# Altium PCB NanoD1.PcbDoc (part 2 of 2)
Units mm, origin at the board's own origin, x right, y up, seen from the top; angles counter-clockwise.
Board outline 66 x 38 mm, 4 copper layers (Top Layer, GND, POWER, Bottom Layer), stack 1.598 mm thick; 143 components, 106 nets, 507 pads, 211 vias.
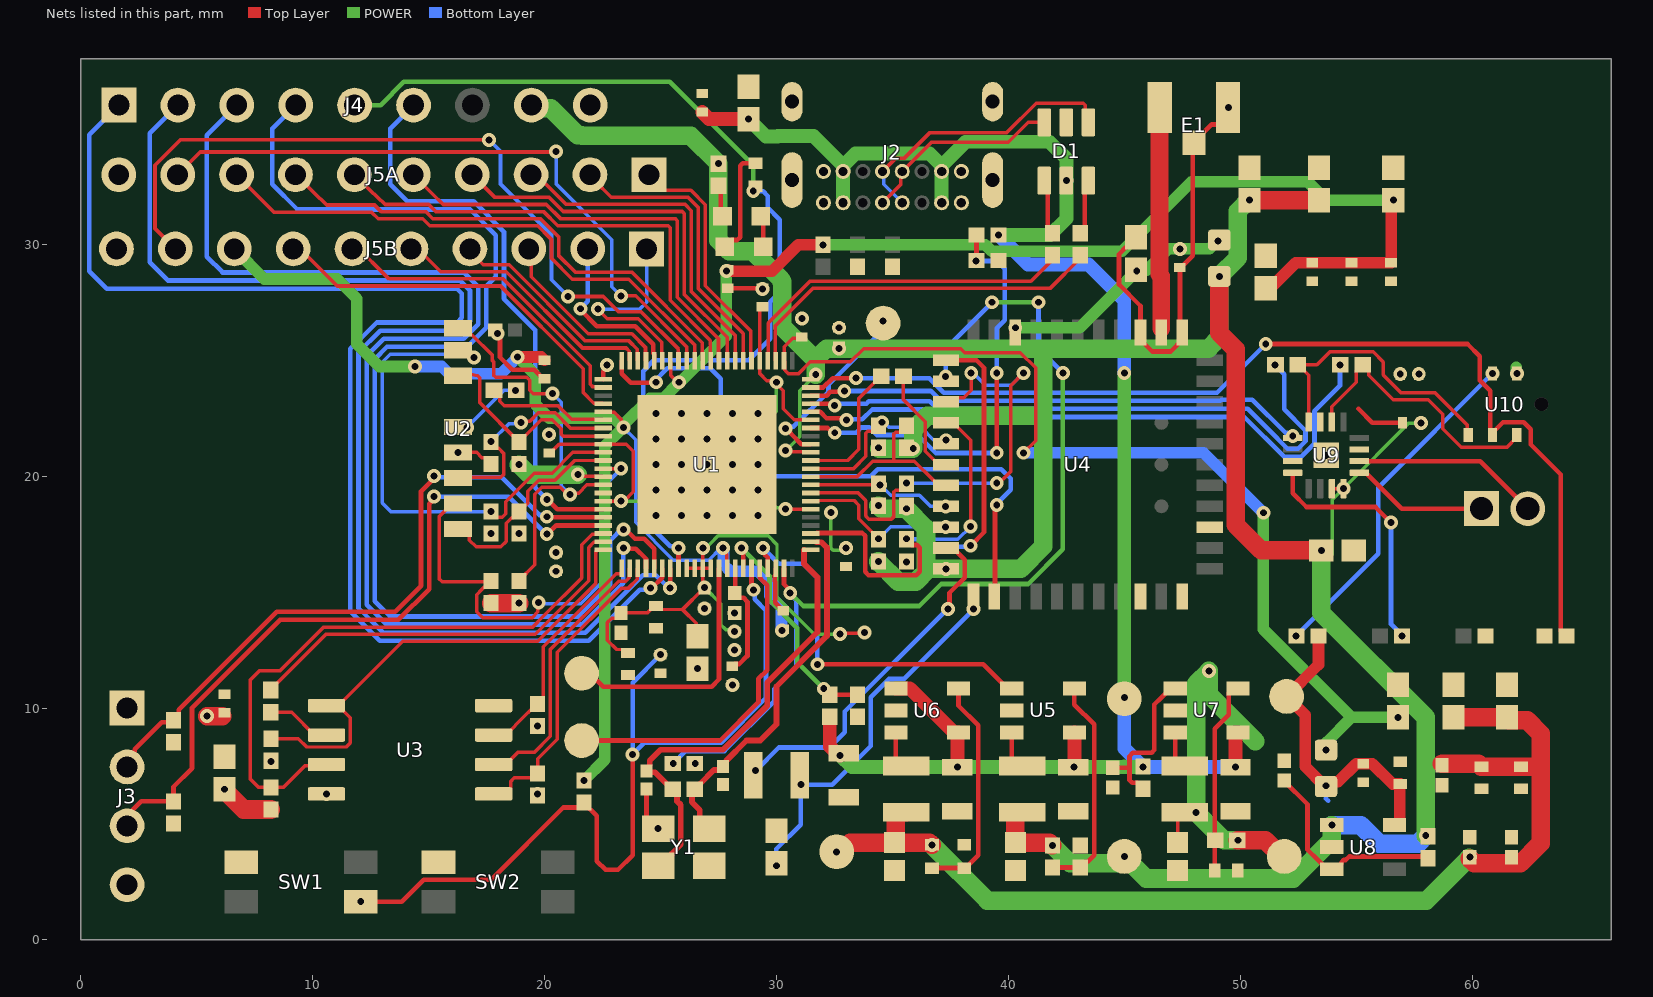
[diagram p4: the nets of this part, all layers, seen from the top]

## Via types
v1: diameter 0.6, hole 0.3, Top Layer to Bottom Layer, 211 vias

## Nets (pads, with @x,y where several pads share a name; then routed paths per layer and width w, separated by ;. In a path a pad name is that pad's centre, name@x,y a point inside that pad or via, vN(x,y) a via of type N, cw(c..) or ccw(c..) an arc to the next point about the centre after c; other vN are vias at no path point) (continued)
EN_1V8: C51.1 R51.1 U8.3 | length 9.2
  Top Layer w0.2: C51.1@51.9,6.871 51.9,6.85 52.9,5.85 52.9,3.896 53.346,3.45 53.35,3.45 53.75,3.05 U8.3@53.95,3.05 54.15,3.05 54.35,3.25 54.35,3.333 54.467,3.45 54.554,3.45 54.704,3.6 R51.1@58.1,3.6
EN_1V35: C50.1 R50.1 U7.1 | length 6.8
  Top Layer w0.2: C50.1@44.5,7.429 45.207,7.429 45.225,7.41 ; R50.1@45.8,6.525 45.8,6.55 45.575,6.775 45.342,6.775 45.225,6.892 45.225,7.41 ; U7.1@47.2,10.85 47,10.85 46.6,10.45 46.596,10.45 46.3,10.154 46.3,8.192 46.183,8.075 45.371,8.075 45.225,7.929 45.225,7.41
FB_1V35: R48.1 R49.2 U7.5 | length 8.4
  Top Layer w0.2: R49.2@48.9,3 48.9,4.275 R48.1@48.925,4.3 48.9,4.325 48.9,9.104 49.5,9.704 49.5,10.65 49.7,10.85 U7.5@49.9,10.85
FB_3V3: R44.1 R45.2 U5.5 | length 9.6
  Top Layer w0.2: R44.1@41.9,3.125 R45.2@43.1,3.125 43.1,3.15 43.325,3.375 43.429,3.375 43.7,3.646 43.7,9.3 42.85,10.15 U5.5@42.85,10.85
FB_VDDC: R46.1 R47.2 U6.5 | length 9.8
  Top Layer w0.2: R46.1@36.7,3.1 R47.2@38.1,3.1 38.15,3.1 38.7,3.65 38.7,9.254 37.85,10.104 U6.5@37.85,10.85
GND: C1.1 C2.2 C3.2 C4.2 C5.2 C6.1 C7.1 C8.2 C9.2 C10.2 C11.1 C12.1 C13.2 C14.2 C15.2 C16.2 C17.2 C18.1 C20.2 C21.2 C22.1 C24.1 C26.1 C28.2 C29.1 C30.1 C31.1 C32.1 C33.2 C34.2 C35.1 C36.1 C37.2 C38.1 C40.2 C41.2 C42.2 C43.2 C44.1 C45.2 C46.2 C47.2 C48.2 C49.2 C50.2 C51.2 C52.2 C53.1 C54.2 C55.1 C56.1 C57.1 C58.2 C59.2 C60.2 C61.1 C62.1 D1.2 E1.2 E1.3 J2.A1 J2.A12 J2.B1 J2.B12 J2.S1 J2.S2 J2.S3 J2.S4 J3.1 J4.9 J5A.10 J5B.10 LED1.C LED2.C R11.1 R12.1 R13.1 R14.1 R17.1 R24.1 R25.1 R37.1 R38.1 R42.1 R45.1 R47.1 R49.1 R56.2 R57.1 SW1.3 SW2.3 U1.1 U1.42 U1.89 U3.4 U4.1 U4.3 U4.20 U4.31 U4.33 U4.36 U5.2 U6.2 U7.2 U8.2 U9.3 U9.11 U9.15 U9.17 Y1.2 Y1.4 | length 32.3
  Top Layer w0.2: C37.2@6.2,7.901 6.4,7.701 C37.2@6.4,7.6 ; v1(8.2,7.7) R13.1@8.2,7.725 ; C59.2@17.871,26.3 C59.2@17.999,26.172 ; v1(17.971,26.144) C59.2@17.999,26.172 ; C26.1@20,24.2 19.95,24.2 19.564,24.586 18.614,24.586 18.079,25.121 18.079,26.114 18.021,26.172 C59.2@17.999,26.172 ; U1.1@22.525,24.175 22.525,24.517 22.7,24.692 v1(22.7,24.8) ; C55.1@24.4,6.51 24.4,5.275 24.875,4.8 v1(24.9,4.8) ; R25.1@26.475,7.6 v1(26.5,7.6) ; C16.2@26.6,11.698 v1(26.6,11.7) ; C24.1@27.97,28.1 C7.1@29.4,28.1 29.4,28.079 v1(29.399,28.078) ; LED1.C@29.325,31.2 29.425,31.1 LED2.C@29.425,29.9 ; U1.42@29.975,16.025 29.975,15.75 29.925,15.7 29.925,15.47 29.95,15.445 29.95,14.55 30.15,14.35 30.15,14.3 30.25,14.2 C29.1@30.3,14.2 ; v1(35.6,16.3) R24.1@35.6,16.325 ; v1(37.3,17.8) U4.20@37.313,17.8 ; C40.2@45.5,30.301 45.5,30.252 45.121,29.873 45.072,29.873 44.771,29.572 44.771,28.267 45.7,27.338 45.7,25.874 46.2,25.374 47,25.374 47.5,25.874 U4.1@47.5,26.187 47.4,26.287 C44.1@47.4,29 47.45,29 47.95,29.5 47.95,34.325 E1.3@48,34.375 48,34.4 48.767,35.167 49.05,35.167 49.475,35.592 E1.2@49.475,35.9 v1(49.5,35.9) ; 55.1,22.9 55.7,22.3 C61.1@57,22.3
  Bottom Layer w0.2: 53.7,6.1 53.8,6
  other v1: 19.7,9.225 28.1,11 28.2,12.5 28.2,14.1 26.9,14.3 20.5,15.9 24.8,18.3 25.9,18.3 27,18.3 28.1,18.3 29.2,18.3 24.8,19.4 25.9,19.4 27,19.4 28.1,19.4 29.2,19.4 24.8,20.5 25.9,20.5 27,20.5 28.1,20.5 29.2,20.5 53.7,20.9 24.8,21.6 25.9,21.6 27,21.6 28.1,21.6 29.2,21.6 20.2,21.8 24.8,22.7 25.9,22.7 27,22.7 28.1,22.7 29.2,22.7 56.9,24.4 32.7,26.4 31.1,26.8
GPIO_A15: J4.6 U1.17 | length 24.5
  Top Layer w0.2: v1(20.097,19) 20.125,19 20.55,18.575 U1.17@22.525,18.575
  Bottom Layer w0.2: J4.6@14.35,36 13.34,34.99 13.34,32.586 14.076,31.85 16.939,31.85 18.25,30.539 18.25,27.65 19.6,26.3 19.6,19.497 v1(20.097,19)
GPIO_AUX0: J4.5 R54.2 U1.30 | length 42.9
  Top Layer w0.2: U1.30@25.775,16.025 v1(25.775,16.9) v1@25.775,17
  POWER w0.2: J4.5@11.81,36 12.936,36 13.936,37 25.4,37 29,33.4 v1(29,32.3)
  Bottom Layer w0.2: v1(25.775,16.9) 25.698,16.977 25.416,16.977 24.25,18.143 24.25,24.533 24.717,25 28.8,25 29.732,25.932 29.732,27.522 30.15,27.94 30.15,31.06 29.625,31.585 29.625,32.08 29.427,32.278 29.022,32.278 v1(29,32.3)
HDR18_0: J5A.1 U1.72 | length 10.5
  Top Layer w0.15: J5A.1@24.5,33 25.175,32.325 25.263,32.325 26.314,32.325 26.939,31.7 26.939,28.212 28.902,26.249 28.902,24.998 U1.72@28.925,24.975
HDR18_1: J5A.2 U1.73 | length 12.7
  Top Layer w0.155: J5A.2@21.96,33 22.153,32.807 22.153,32.747 22.877,32.023 26.189,32.023 26.636,31.575 26.636,28.087 28.575,26.148 U1.73@28.575,24.975
HDR18_2: J5A.3 U1.74 | length 14.8
  Top Layer w0.155: J5A.3@19.42,33 19.656,33 20.938,31.718 26.063,31.718 26.332,31.449 26.332,27.961 28.225,26.068 U1.74@28.225,24.975
HDR18_3: J5A.4 U1.75 | length 17
  Top Layer w0.155: J5A.4@16.88,33 17.861,32.019 20.207,32.019 20.812,31.413 25.937,31.413 26.027,31.323 26.027,27.835 27.875,25.987 U1.75@27.875,24.975
HDR18_4: J5A.5 U1.76 | length 19
  Top Layer w0.155: J5A.5@14.34,33 15.14,32.2 15.626,31.714 20.081,31.714 20.686,31.109 25.632,31.109 25.722,31.018 25.722,27.708 27.502,25.929 27.502,24.998 U1.76@27.525,24.975
HDR18_5: J5A.6 U1.77 | length 21
  Top Layer w0.155: J5A.6@11.8,33 12.456,32.344 13.126,31.714 15.001,31.714 15.305,31.409 19.955,31.409 20.564,30.8 20.628,30.8 25.327,30.8 25.418,30.709 25.418,27.582 27.152,25.848 27.152,24.998 U1.77@27.175,24.975
HDR18_6: J5A.7 U1.78 | length 22.4
  Top Layer w0.155: U1.78@26.825,24.975 26.802,24.998 26.802,25.759 23.762,28.8 21.321,28.8 20.605,29.517 20.605,30.328 19.828,31.105 15.179,31.105 14.875,31.409 12.95,31.409 12.668,31.691 10.609,31.691 J5A.7@9.474,32.786 ; J5A.7@9.26,33 J5A.7@9.474,32.786 ; J5A.7@9.26,33 J5A.7@9.474,32.786 ; J5A.7@9.26,33 J5A.7@9.474,32.786
HDR18_7: J5A.8 U1.79 | length 24
  Top Layer w0.155: J5A.8@6.72,33 8.333,31.387 12.542,31.387 12.824,31.105 14.748,31.105 15.053,30.8 19.702,30.8 20.233,30.269 20.3,30.202 20.3,29.391 21.195,28.495 23.635,28.495 26.475,25.656 U1.79@26.475,24.975
HDR18_8: J5A.9 U1.80 | length 28.5
  Top Layer w0.155: J5A.9@4.18,33 5.157,33.977 20.477,33.977 v1(20.5,34) ; v1(23.3,27.773) 23.927,27.773 26.125,25.575 U1.80@26.125,24.975
  Bottom Layer w0.155: v1(20.5,34) 20.5,32.6 22.9,30.2 22.9,28.173 v1(23.3,27.773)
HDR18_9: J5B.9 U1.81 | length 33.2
  Top Layer w0.155: J5B.9@4.08,29.8 3.203,30.677 3.203,33.405 4.303,34.505 v1(17.608,34.505) ; v1(21.02,27.749) 21.023,27.746 22.535,27.746 23.19,27.091 24.164,27.091 25.775,25.48 U1.81@25.775,24.975
  Bottom Layer w0.155: v1(17.608,34.505) 18.1,34.012 18.1,32.6 20.3,30.4 20.3,28.469 v1(21.02,27.749)
HDR18_10: J5B.1 U1.83 | length 9.5
  Top Layer w0.15: v1(22.3,27.2) 22.711,26.789 24.038,26.789 25.05,25.777 25.05,25 U1.83@25.075,24.975 ; J5B.1@24.5,30 J5B.1@25.075,29.425
  Bottom Layer w0.15: v1@22.313,27.2 24.094,27.2 24.4,27.506 J5B.1@24.4,29.8
HDR18_11: J5B.2 U1.84 | length 7.2
  Top Layer w0.2: v1(21.55,27.219) 21.55,27.172 22.258,26.464 23.904,26.464 24.68,25.687 24.68,25.295 24.725,25.25 U1.84@24.725,24.975
  Bottom Layer w0.2: v1(21.55,27.219) 21.55,27.228 21.86,27.538 J5B.2@21.86,29.8
HDR18_12: J5B.3 U1.85 | length 8.2
  Top Layer w0.155: J5B.3@19.43,29.99 19.43,28.594 21.887,26.137 23.768,26.137 24.353,25.552 24.353,24.997 U1.85@24.375,24.975
HDR18_13: J5B.4 U1.86 | length 9.6
  Top Layer w0.155: J5B.4@16.78,29.8 16.78,29.688 17.355,29.114 18.479,29.114 21.761,25.832 23.642,25.832 24.002,25.472 24.002,24.998 U1.86@24.025,24.975
HDR18_14: J5B.5 U1.87 | length 11.6
  Top Layer w0.155: J5B.5@14.34,30 15.531,28.809 18.352,28.809 21.634,25.527 23.516,25.527 23.652,25.391 23.652,24.998 U1.87@23.675,24.975
HDR18_15: J5B.6 U1.2 | length 13.7
  Top Layer w0.155: J5B.6@11.8,30 13.295,28.505 18.226,28.505 21.973,24.758 21.973,23.966 22.091,23.848 22.502,23.848 U1.2@22.525,23.825
HDR18_16: J5B.7 U1.4 | length 16.7
  Top Layer w0.155: J5B.7@9.26,30 11.06,28.2 18.1,28.2 21.668,24.632 21.668,23.606 22.127,23.148 22.502,23.148 U1.4@22.525,23.125
I2C0_SCL: J4.1 U1.28 | length 57.4
  Top Layer w0.2: v1(24.575,15.175) 24.633,15.175 25.075,15.617 U1.28@25.075,16.025
  Bottom Layer w0.2: J4.1@1.65,36 0.371,34.721 0.371,28.829 1.115,28.085 16.227,28.085 16.434,27.878 16.434,26.834 16.227,26.627 12.771,26.627 11.629,25.485 11.629,14.171 12.9,12.9 21.9,12.9 24.099,15.099 24.499,15.099 v1(24.575,15.175)
I2C0_SDA: J4.2 U1.29 | length 55.3
  Top Layer w0.2: v1(25.418,15.182) 25.425,15.189 U1.29@25.425,16.025
  Bottom Layer w0.2: J4.2@4.19,36 2.97,34.78 2.97,29.23 3.765,28.435 16.372,28.435 16.784,28.023 16.784,26.689 16.372,26.277 12.916,26.277 11.979,25.34 11.979,14.316 13.045,13.25 21.755,13.25 24.23,15.725 24.803,15.725 25.346,15.182 v1(25.418,15.182)
I2S_BCLK: R58.1 U1.63 | length 26.3
  Top Layer w0.2: U1.63@31.475,23.125 32.328,23.125 32.406,23.047 v1(32.514,23.047) ; v1(51.5,24.8) R58.1@51.521,24.8
  Bottom Layer w0.2: v1(32.514,23.047) 32.59,23.124 33.885,23.124 33.986,23.225 36.607,23.225 36.932,22.9 50.322,22.9 51.207,22.015 52.037,21.185 52.493,21.185 52.815,21.507 52.815,21.963 51.9,22.878 51.9,24.4 v1(51.5,24.8)
I2S_BCLK_A: R58.2 U9.16 U10.1 | length 12.3
  Top Layer w0.15: R58.2@52.479,24.8 R58.2@52.5,24.8 ; U9.16@52.95,22.335 52.95,24.35 R58.2@52.5,24.8 ; U10.1@59.83,21.77 59.793,21.807 59.793,22.207 58.4,23.6 56.932,23.6 56.168,24.364 56.168,24.923 55.729,25.361 53.871,25.361 53.309,24.8 R58.2@52.5,24.8
I2S_DIN: R57.2 U1.65 U10.2 | length 45.4
  Top Layer w0.2: U1.65@31.475,23.825 32.023,23.825 32.422,24.224 v1(33.436,24.224) ; v1(51.1,25.7) 59.8,25.7 60.33,25.17 60.33,24.126 60.78,23.676 60.78,21.97 60.88,21.87 61.33,22.32 62.234,22.32 62.53,22.024 62.53,21.366 63.825,20.072 63.825,13.325 64.05,13.1 R57.2@64.075,13.1
  Bottom Layer w0.2: v1(33.436,24.224) 36.598,24.224 37.222,23.6 49,23.6 v1(51.1,25.7)
I2S_DOUT: U1.64 U9.1 | length 21.7
  Top Layer w0.2: U1.64@31.475,23.475 32.168,23.475 32.326,23.633 32.885,23.633 v1(32.926,23.674)
  Bottom Layer w0.2: v1(32.926,23.674) 36.653,23.674 37.077,23.25 49.145,23.25 49.195,23.3 50.522,23.3 51.952,21.87 52.021,21.87 52.157,21.735 v1(52.265,21.735)
I2S_LRCK: R59.1 U1.62 | length 27
  Top Layer w0.2: U1.62@31.475,22.775 31.883,22.775 32.16,22.497 32.948,22.497 v1(33.025,22.421) ; v1(54.3,24.8) R59.1@54.321,24.8
  Bottom Layer w0.2: v1(33.025,22.421) 33.054,22.45 33.706,22.45 34.131,22.875 36.462,22.875 36.787,22.55 50.177,22.55 51.892,20.835 52.638,20.835 53.2,21.397 53.2,22.8 54.3,23.9 v1(54.3,24.8)
I2S_LRCK_A: R59.2 U9.14 U10.3 | length 12
  Top Layer w0.15: U9.14@53.95,22.335 53.95,22.997 55,24.047 55,24.539 55.261,24.8 R59.2@55.279,24.8 55.257,24.779 R59.2@55.257,24.657 ; R59.2@55.247,24.647 55.434,24.647 55.542,24.539 55.542,24.351 56.593,23.3 58.1,23.3 58.733,22.667 58.733,22.048 59.537,21.245 61.505,21.245 61.93,21.67 U10.3@61.93,21.77
JTAG_TCK: J4.4 U1.27 | length 50.6
  Top Layer w0.2: v1@23.395,17.795 23.405,17.795 23.9,17.3 24.3,17.3 24.725,16.875 U1.27@24.725,16.025
  Bottom Layer w0.2: J4.4@9.27,36 8.26,34.99 8.26,32.586 9.346,31.5 16.794,31.5 17.9,30.394 17.9,28.6 17.484,28.184 17.484,26.417 17.466,26.399 17.466,26.382 16.662,25.577 13.206,25.577 12.679,25.05 12.679,14.606 13.335,13.95 21.465,13.95 22.825,15.31 22.825,17.225 v1@23.395,17.795
  other v1: 23.4,17.7
JTAG_TMS: J4.3 U1.26 | length 52.1
  Top Layer w0.2: v1@23.55,16.876 23.932,16.876 24.375,16.433 U1.26@24.375,16.025
  Bottom Layer w0.2: J4.3@6.73,36 5.43,34.7 5.43,29.47 6.115,28.785 16.517,28.785 17.134,28.167 17.134,26.544 16.517,25.927 13.061,25.927 12.329,25.195 12.329,14.461 13.19,13.6 21.61,13.6 23.4,15.39 v1(23.4,16.9)
LED_PWR_A: LED1.A R53.1 | length 1.4
  Top Layer w0.2: LED1.A@27.6,31.2 R53.1@27.6,32.567
LED_USR_A: LED2.A R54.1 | length 4.5
  Top Layer w0.2: LED2.A@27.775,29.9 28.057,30.182 28.317,30.182 28.434,30.299 28.434,33.383 28.551,33.5 R54.1@29,33.5
LPO: U1.88 U4.24 | length 27.5
  Top Layer w0.2: U1.88@23.325,24.975 23.325,24.417 23.72,24.022 24.672,24.022 v1@24.7,24.05 ; U4.24@39.4,14.813 39.423,14.836 v1@39.423,18.577
  Bottom Layer w0.2: v1@24.7,24.05 25.3,24.65 27.15,24.65 27.6,24.2 27.6,20.293 27.893,20 34.072,20 34.372,20.3 39.7,20.3 40.1,19.9 40.1,19.422 v1@39.43,18.752
  other v1: 39.5,18.752 24.8,24.05
LX_1V35: L3.1 U7.3 | length 1.7
  Top Layer w0.2: U7.3@47.2,8.95 47.2,7.8 47.5,7.5 L3.1@47.6,7.5
LX_3V3: L1.1 U5.3 | length 1.7
  Top Layer w0.2: U5.3@40.15,8.95 40.15,7.8 40.45,7.5 L1.1@40.6,7.5
LX_VDDC: L2.1 U6.3 | length 1.7
  Top Layer w0.2: U6.3@35.15,8.95 35.15,7.8 35.45,7.5 L2.1@35.6,7.5
MIC_EN: R60.1 U10.8 | length 14.9
  Top Layer w0.2: v1(52.4,13.1) R60.1@52.425,13.1
  Bottom Layer w0.2: v1(52.4,13.1) 55.95,16.65 55.95,19.5 v1(60.88,24.43)
PWM0_BUCK: TP3.1 U1.58 | length 7.9
  Top Layer w0.2: v1(30.4,22.058) 30.9,21.558 30.9,21.542 31.067,21.375 U1.58@31.475,21.375
  Bottom Layer w0.2: v1(30.4,22.058) 30.477,22.134 30.734,22.134 32.245,23.645 32.245,23.945 34.523,26.223 34.523,26.609 v1(34.6,26.686)
PWR_SEQ2: U1.41 U5.1 | length 16.4
  Top Layer w0.2: v1(29.425,16.9) 29.502,16.823 29.502,16.615 29.625,16.492 U1.41@29.625,16.025 ; v1(31.766,11.887) 38.913,11.887 39.95,10.85 U5.1@40.15,10.85
  Bottom Layer w0.2: v1(29.425,16.9) 30.099,16.226 31.152,16.226 31.766,15.612 v1(31.766,11.887)
RESET_N: C57.2 R52.2 SW1.2 U1.39 | length 37.8
  Top Layer w0.2: v1(12.075,1.65) 13.846,1.65 14.796,2.6 17.7,2.6 20.813,5.713 21.488,5.713 R52.2@21.7,5.925 ; R52.2@21.7,5.9 22.25,5.35 22.25,3.401 22.631,3.02 23.169,3.02 23.8,3.651 v1(23.8,8) ; U1.39@28.925,16.025 28.925,15.298 29.014,15.208 v1(29.014,15.1)
  Bottom Layer w0.2: v1(25,12.3) 23.8,11.1 v1(23.8,8) 24.3,8.5 27.613,8.5 29.55,10.437 29.55,14.204 29.058,14.696 29.058,15.056 v1(29.014,15.1)
SD0_CD: R7.2 U1.14 U2.9 | length 18
  Top Layer w0.15: U2.9@16.275,26.375 16.525,26.375 16.8,26.1 16.868,26.1 17.754,25.214 17.754,24.986 17.8,24.94 17.8,24.349 17.888,24.261 19.229,24.261 19.361,24.129 19.361,23.71 19.511,23.56 v1(20.345,23.56) ; R7.2@18.9,15.475 18.9,15.5 19.572,16.172 19.572,19.217 19.879,19.525 20.675,19.525 21,19.2 v1(21.1,19.2) 21.171,19.271 21.471,19.271 21.825,19.625 U1.14@22.525,19.625
  Bottom Layer w0.15: v1(20.345,23.56) 20.725,23.18 20.725,19.575 v1(21.1,19.2)
SD0_CLK: R1.2 U1.6 | length 5.4
  Top Layer w0.15: R1.2@17.821,23.7 18.067,23.455 18.067,23.233 18.265,23.035 20.582,23.035 21.167,22.45 22.5,22.45 U1.6@22.525,22.425
SD0_CLK_SD: R1.1 U2.5 | length 3.2
  Top Layer w0.15: U2.5@16.275,22.125 16.625,22.125 v1(16.65,22.1) ; v1(18.757,23.7) R1.1@18.779,23.7
  Bottom Layer w0.15: v1(16.65,22.1) 18.25,23.7 v1(18.757,23.7)
SD0_CMD: R2.2 U1.7 U2.3 | length 9.3
  Top Layer w0.15: U2.3@16.275,19.925 16.3,19.95 18.118,19.95 18.25,20.082 18.25,20.968 18.018,21.2 17.95,21.2 17.7,21.45 R2.2@17.7,21.475 v1(17.7,21.5) ; v1(18.991,22.309) 19.053,22.371 19.372,22.371 19.736,22.735 20.457,22.735 21.117,22.075 U1.7@22.525,22.075
  Bottom Layer w0.15: v1(17.7,21.5) 18.466,22.266 18.949,22.266 v1(18.991,22.309)
SD0_D0: R3.2 U1.8 U2.7 | length 8.9
  Top Layer w0.15: U2.7@16.3,24.5 16.312,24.497 17.112,24.325 17.2,24.237 17.2,23.175 R3.2@18.9,21.475 18.9,21.5 19.15,21.75 19.175,21.75 19.86,22.435 20.333,22.435 20.725,22.043 20.725,21.813 20.813,21.725 U1.8@22.525,21.725
SD0_D1: R4.2 U1.10 U2.8 | length 22.6
  Top Layer w0.15: U2.8@16.275,25.425 16.532,25.425 16.754,25.203 16.876,25.203 v1(16.962,25.116) ; v1(17.7,18.475) 17.95,18.225 18.183,18.225 18.332,18.375 18.332,18.9 19.557,20.125 20.325,20.125 21.225,21.025 U1.10@22.8,21.025
  Bottom Layer w0.15: v1(16.962,25.116) 16.841,25.116 16.705,25.252 13.341,25.252 13.004,24.915 13.004,18.842 13.371,18.475 v1(17.7,18.475)
SD0_D2: R5.2 U1.11 U2.1 | length 9
  Top Layer w0.15: U2.1@16.275,17.725 16.484,17.725 16.759,17.45 16.759,17.241 17.05,16.95 18.118,16.95 18.35,17.182 18.35,17.968 18.582,18.2 18.65,18.2 18.9,18.45 R5.2@18.9,18.475 18.9,18.5 19.15,18.75 19.184,18.75 19.272,18.838 19.272,19.342 19.755,19.825 20.449,19.825 21.299,20.675 U1.11@22.525,20.675
SD0_D3: R6.2 U1.12 U2.2 | length 20
  Top Layer w0.15: U2.2@16.275,18.825 16.025,18.825 15.45,18.25 15.45,15.582 15.582,15.45 17.675,15.45 R6.2@17.7,15.475 17.7,15.45 17.45,15.2 17.382,15.2 17.282,15.1 17.075,14.893 17.075,14.157 17.332,13.9 19.468,13.9 19.713,14.145 19.713,14.513 v1(19.75,14.55) ; U1.12@22.525,20.325 v1@23.212,20.325
  Bottom Layer w0.15: v1(19.75,14.55) 19.8,14.5 21.555,14.5 22.5,15.445 22.5,19.512 23.212,20.224 v1@23.212,20.325
  other v1: 23.3,20.325
SD0_PWR_EN: U1.15
SD1_CLK: R18.2 U1.56 | length 5.8
  Top Layer w0.15: U1.56@31.475,20.675 32.421,20.675 33.067,20.675 33.55,21.158 33.55,23.35 34.5,24.3 R18.2@34.521,24.3
SD1_CLK_W: R18.1 U4.17 | length 4.7
  Top Layer w0.15: R18.1@35.479,24.3 35.479,23.29 36.425,22.343 36.425,21.076 37.001,20.5 U4.17@37.313,20.5
SD1_CMD: R19.2 U1.55 U4.16 | length 7.4
  Top Layer w0.15: U1.55@31.475,20.325 33.325,20.325 33.85,20.85 33.85,21.85 33.941,21.941 34.166,21.941 R19.2@34.4,22.175
  Bottom Layer w0.15: v1(34.55,22.325) 34.638,22.325 34.863,22.1 36.237,22.1 36.787,21.55 v1(37.313,21.55)
SD1_D0: R20.2 U1.54 U4.18 | length 8.3
  Top Layer w0.15: U1.54@31.475,19.975 33.475,19.975 34.15,20.65 35.05,20.65 ; R20.2@35.6,22.175 35.6,22.15 35.35,21.9 35.141,21.9 35.05,21.809 35.05,20.65 ; 36.75,19.85 35.95,20.65 35.05,20.65 ; U4.18@36.751,19.85 37,19.6 U4.18@37.05,19.6 ; U4.18@37.25,19.537 U4.18@37.313,19.6
SD1_D1: R21.2 U1.53 U4.19 | length 6.2
  Top Layer w0.15: U1.53@31.475,19.625 34.35,19.625 R21.2@34.4,19.675 34.425,19.675 v1(34.475,19.625)
  Bottom Layer w0.15: v1(34.475,19.625) 34.925,19.175 36.167,19.175 36.642,18.7 v1(37.3,18.7)
SD1_D2: R22.2 U1.52 U4.14 | length 20.7
  Top Layer w0.15: U1.52@31.475,19.275 33.525,19.275 33.85,18.95 33.85,18.282 33.982,18.15 34.962,18.15 35.05,18.238 35.05,19.312 35.138,19.4 35.35,19.4 35.6,19.65 R22.2@35.6,19.675 v1(35.6,19.7) ; U4.14@37.001,23.2 U4.14@37.313,23.2 37.488,23.375 38.075,23.375 38.4,23.7 v1(38.4,24.45) ; v1@39.4,19.5 40.1,20.2 40.1,23.9 v1(40.65,24.45)
  Bottom Layer w0.15: v1(35.6,19.7) v1(39.5,19.7) ; v1(38.4,24.45) 38.492,24.45 39.017,23.925 40.125,23.925 v1(40.65,24.45)
SD1_D3: R23.2 U1.51 U4.15 | length 13.7
  Top Layer w0.15: U1.51@31.475,18.925 31.5,18.95 31.863,18.95 33.35,18.95 33.55,18.75 33.55,18.158 34.15,17.558 34.15,17.55 34.392,17.308 R23.2@34.4,17.308 ; R23.2@34.4,17.275 v1(34.4,17.3) ; U4.15@37.313,22.3 37.626,22.3 37.8,22.125 38.374,21.552 v1@38.374,17.826
  Bottom Layer w0.15: v1(34.4,17.3) 34.925,17.825 36.114,17.825 36.664,17.275 37.823,17.275 v1@38.374,17.826
  other v1: 38.375,17.826
SD_MODE_SET: R55.2 U9.4 | length 10.7
  Top Layer w0.2: U9.4@52.265,20.15 52.265,19.261 52.857,18.669 55.831,18.669 v1(56.5,18)
  Bottom Layer w0.2: v1(56.5,18) 56.5,13.627 56.975,13.152 v1(56.975,13.1)
SEQ1_TP: TP2.1 U1.40 | length 14.4
  Top Layer w0.2: TP2.1@21.6,8.6 27.57,8.6 29.225,10.255 29.225,11.255 29.6,11.63 29.6,15.3 29.45,15.45 29.442,15.45 29.275,15.617 U1.40@29.275,16.025
SPI_CLK: R8.2 U1.21 | length 17.8
  Top Layer w0.15: R8.2@8.2,10.779 8.2,10.8 10.575,13.175 19.591,13.175 21.9,15.484 21.9,16.922 22.128,17.15 22.5,17.15 U1.21@22.525,17.175
SPI_CLK_F: R8.1 U3.6 | length 2.8
  Top Layer w0.15: R8.1@8.2,9.821 9.094,9.821 10.08,8.835 U3.6@10.595,8.835
SPI_CS: R9.2 U1.25 U3.1 | length 13.3
  Top Layer w0.15: U3.1@17.805,6.295 18.32,6.295 18.535,6.51 18.535,6.835 18.7,7 19.525,7 R9.2@19.7,7.175 19.7,7.808 20.55,8.658 20.55,12.401 23.324,15.175 23.622,15.175 24.002,15.555 24.002,16.002 U1.25@24.025,16.025
SPI_HOLD: R10.2 U1.20 U3.7 | length 26.8
  Top Layer w0.15: U3.7@10.595,7.565 10.533,7.503 9.653,7.503 8.725,6.575 R10.2@8.2,6.575 7.676,6.575 7.3,6.951 7.3,11.2 7.7,11.6 8.576,11.6 10.451,13.475 19.467,13.475 19.992,14 21.6,15.608 21.6,17.047 22.055,17.502 22.502,17.502 U1.20@22.525,17.525
SPI_MISO: U1.24 U3.2 | length 11.8
  Top Layer w0.15: U3.2@17.805,7.565 18.32,7.565 18.855,8.1 19.568,8.1 20.25,8.782 20.25,12.526 23.199,15.475 23.497,15.475 23.65,15.628 23.65,16 U1.24@23.675,16.025
SPI_MOSI: R13.2 U1.22 U3.5 | length 21
  Top Layer w0.15: R13.2@8.2,8.675 9.384,8.675 9.739,8.32 11.451,8.32 11.625,8.494 11.625,9.59 U3.5@11.11,10.105 ; U3.5@10.595,10.105 U3.5@11.11,10.105 ; U1.22@22.525,16.825 22.25,16.825 22.225,16.8 22.225,16.737 22.2,16.712 22.2,15.359 19.716,12.875 13.88,12.875 U3.5@11.11,10.105
SPI_WP: R14.2 U1.23 U3.3 | length 9.9
  Top Layer w0.15: U3.3@17.805,8.835 18.32,8.835 19.15,9.665 19.15,9.668 19.282,9.8 19.285,9.8 19.385,9.9 19.45,9.9 R14.2@19.7,10.15 ; R14.2@19.7,10.175 19.95,10.425 19.95,10.538 19.95,12.65 23.088,15.788 23.3,15.788 23.325,15.813 U1.23@23.325,16.025
SPK_N: J6.2 U9.10 | length 8.1
  Top Layer w0.2: U9.10@55.135,20.65 60.35,20.65 J6.2@62.4,18.6
SPK_P: J6.1 U9.9 | length 5.9
  Top Layer w0.2: U9.9@55.135,20.15 55.42,20.15 56.97,18.6 J6.1@60.4,18.6
UART0_RX: J3.3 R12.2 U1.19 | length 31.2
  Top Layer w0.2: J3.3@1.8,5.16 2.615,5.975 R12.2@4,5.975 ; R12.2@4,6.175 4,6.6 4.8,7.4 4.8,10.005 8.595,13.8 13.7,13.8 15.025,15.125 15.025,18.807 15.225,19.007 v1(15.225,19.116) ; v1(20.097,17.5) 20.125,17.5 20.5,17.875 U1.19@22.525,17.875
  Bottom Layer w0.2: v1(15.225,19.116) 18.453,19.116 20.069,17.5 v1(20.097,17.5)
UART0_TX: J3.2 R11.2 U1.18 | length 29.1
  Top Layer w0.2: J3.2@1.8,7.7 1.888,7.7 2.322,8.134 2.322,8.222 3.492,9.392 3.817,9.392 R11.2@3.9,9.475 ; R11.2@4,9.475 4.225,9.7 4.225,9.925 8.45,14.15 13.555,14.15 14.675,15.27 14.675,19.343 15.225,19.893 v1(15.225,20) ; v1(20.097,18.25) 20.122,18.225 U1.18@22.525,18.225
  Bottom Layer w0.2: v1(15.225,20) 15.275,19.95 18.15,19.95 19.773,18.327 20.02,18.327 v1(20.097,18.25)
USB_DM: R40.1 U1.70 | length 15.2
  Top Layer w0.155: U1.70@29.625,24.975 29.648,24.998 29.648,25.451 29.648,26.602 31.446,28.4 40.975,28.4 R40.1@42,29.425
USB_DM_CON: D1.3 J2.A7 J2.B7 | length 8.7
  Top Layer w0.155: J2.A7@34.575,31.79 35.368,32.583 35.368,33.083 J2.B7@35.425,33.14 36.685,34.4 40,34.4 40.855,35.255 D1.3@41.55,35.255
USB_DM_MID: D1.4 R40.2 | length 2.6
  Top Layer w0.2: D1.4@41.55,32.745 41.7,32.595 41.7,30.7 42,30.4 R40.2@42,30.375
USB_DP: R39.1 U1.69 | length 15.9
  Top Layer w0.155: 29.952,25.451 29.952,26.476 31.572,28.095 41.795,28.095 43.1,29.4 R39.1@43.1,29.425 ; 29.952,25.451 29.952,24.998 U1.69@29.975,24.975
USB_DP_CON: D1.1 J2.A6 J2.B6 | length 12.7
  Top Layer w0.155: J2.B6@34.575,33.14 35.136,33.701 35.501,33.701 36.6,34.8 39.917,34.8 41.204,36.087 43.226,36.087 43.316,35.997 43.316,35.389 D1.1@43.45,35.255 ; J2.A6@35.425,31.79 35.435,31.8 J2.A6@35.6,31.8
  Bottom Layer w0.155: J2.B6@34.575,33.14 34.632,33.083 34.632,32.583 J2.A6@35.425,31.79
USB_DP_MID: D1.6 R39.2 | length 2.5
  Top Layer w0.2: R39.2@43.1,30.375 43.3,30.575 43.3,32.595 D1.6@43.45,32.745
USB_VBUS_DET: R41.1 R42.2 U1.60 | length 19.3
  Top Layer w0.2: U1.60@31.475,22.075 32.202,22.075 32.407,21.871 v1(32.515,21.871) ; R42.2@38.625,29.3 R41.1@38.625,30.4 ; v1(39.5,21.008) v1(39.5,24.45)
  Bottom Layer w0.2: v1(32.515,21.871) 33.434,21.871 33.663,22.1 33.997,22.1 34.322,21.775 36.103,21.775 36.878,21 v1@39.592,21 ; v1(38.6,29.275) 39.525,29.275 39.85,28.95 39.85,26.728 39.5,26.378 v1(39.5,24.45)
VBAT_DET: R16.1 R17.2 U1.38 | length 9.6
  Top Layer w0.2: v1(28.5,16.9) 28.575,16.825 U1.38@28.575,16.025 ; R16.1@32.3,10.575 R17.2@33.5,10.575
  POWER w0.2: v1(28.5,16.9) 29.7,15.7 29.7,14.65 30.9,13.45 30.9,11.975 v1(32.041,10.834)
VBUS_5V: C41.1 C42.1 C43.1 C45.1 C47.1 C54.1 D1.5 J2.A4 J2.A9 J2.B4 J2.B9 R16.2 R41.2 R50.2 TP8.1 U5.4 U6.1 U6.4 U7.4 | length 81.7
  Top Layer w0.6: C43.1@26.8,35.7 27.101,35.399 v1(28.8,35.399) ; R16.2@32.3,9.625 32.3,8.35 32.6,8.05 C54.1@32.65,8.05 ; v1(32.739,7.961) 32.778,8 32.85,8 C54.1@32.9,8.05 ; U6.1@35.15,10.85 35.75,10.85 37.65,8.95 U6.4@37.8,8.95 ; v1(37.8,7.45) U6.4@37.8,8.95 ; U6.4@37.85,8.95 U6.4@37.8,8.95 ; C45.1@42.8,7.45 42.85,7.5 U5.4@42.85,8.95 ; v1(49.8,7.45) 49.8,8.95 U7.4@49.9,8.95
  POWER w0.6: v1(28.8,35.399) 29.553,34.647 30.05,34.647 30.063,34.66 31.601,34.66 32.865,33.396 32.865,33.15 J2.B4@32.875,33.14 ; v1(32.739,7.961) 33.25,7.45 v1(37.8,7.45) v1@42.8,7.45 ; J2.A9@32.875,31.79 J2.B4@32.875,33.14 ; J2.A4@37.125,31.79 J2.B9@37.125,33.14 ; v1(39.575,30.4) 41.8,30.4 42.5,31.1 v1(42.5,32.745) 42.5,33.7 41.78,34.42 38.159,34.42 37.135,33.396 37.135,33.15 J2.B9@37.125,33.14 ; v1(42.825,7.45) 45.775,7.45 v1@45.8,7.475 ; v1(45,10.45) v1(45,24.45) ; J2.B4@32.875,33.14 32.885,33.15 32.885,33.396 33.404,33.915 36.596,33.915 37.115,33.396 37.115,33.15 J2.B9@37.125,33.14
  Bottom Layer w0.6: v1(39.575,30.4) 40.85,29.125 43.45,29.125 45,27.575 v1(45,24.45) ; v1(45,10.45) 45,8.25 v1(45.8,7.45) ; v1@45.825,7.45 v1(49.8,7.45)
VDD1V8: C20.1 C24.2 C26.2 C28.1 C29.2 C30.2 C31.2 C32.2 C52.1 C53.2 C62.2 FB2.1 J5B.8 R15.2 R52.1 R60.2 TP6.1 U1.5 U1.36 U1.82 U8.5 U10.7 | length 120.1
  Top Layer w0.15: U1.5@22.5,22.8 U1.5@22.525,22.775 22.55,22.75 23.008,22.75 23.314,22.444 23.314,22.186 v1(23.4,22.1) ; U1.82@25.42,24.961 25.45,24.932 25.45,24.342 25.8,23.992 v1@25.8,23.95 ; v1(27.7,16.9) 27.7,16.778 27.853,16.625 27.853,16.047 U1.36@27.875,16.025 ; 30.792,29.849 30.943,30
  Top Layer w0.5: v1(18.842,25.136) 19.864,25.136 C26.2@20,25 ; C24.2@27.9,28.9 v1(27.843,28.843) 29.811,28.843 30.943,29.975 v1(32,29.975) ; C28.1@51.1,28.099 51.299,28.099 52.4,29.2 C31.2@54.8,29.2 C32.2@56.5,29.2 56.516,29.2 56.516,31.815 v1(56.6,31.899) ; R60.2@53.337,13.062 R60.2@53.375,13.1 53.375,11.875 TP6.1@52,10.5 52.8,9.7 52.8,7.48 53.63,6.65 v1(53.7,6.65) ; FB2.1@53.7,6.615 53.9,6.815 54.215,6.815 55,7.6 C53.2@55.3,7.6 55.7,7.6 56.575,6.725 C52.1@56.9,6.725 ; U8.5@56.65,4.95 56.825,4.95 56.875,5 C52.1@56.875,6.7
  POWER w0.5: J5B.8@6.62,29.8 7.92,28.5 11.058,28.5 11.9,27.658 11.9,25.7 12.873,24.727 v1(14.406,24.727) ; v1(18.842,25.136) 19.6,24.378 19.6,23.1 20.2,22.5 23,22.5 v1(23.4,22.1) 22.6,21.3 22.6,7.775 v1(21.7,6.875) ; v1@23.419,22.119 23.419,22.238 24.531,23.35 25.123,23.35 25.773,24 25.8,24 27.843,26.043 v1(27.843,28.843) ; v1(32,29.975) 39.01,29.975 39.285,29.7 44.9,29.7 47.899,32.699 52.905,32.699 53.705,31.899 v1(56.6,31.899) ; v1@61.911,24.689 61.911,24.449 v1(61.93,24.43)
  Bottom Layer w0.15: v1(23.4,22.1) 23.925,21.575 23.925,18.008 25.558,16.375 27.082,16.375 27.607,16.9 v1(27.7,16.9)
  Bottom Layer w0.5: v1(14.406,24.727) 15.573,24.727 15.884,24.416 18.122,24.416 v1(18.842,25.136) ; v1@27.7,16.873 27.719,16.854 27.719,16.193 28.012,15.9 29.204,15.9 29.714,15.39 29.714,14.848 30.217,14.345 30.217,13.355 v1(30.236,13.336)
  other v1: 25.8,24.05 57.7,24.4
VDD1V35: C11.2 C12.2 C13.1 C14.1 C15.1 C16.1 C49.1 L3.2 R48.2 TP5.1 U1.31 U1.32 U1.33 U1.34 | length 40.5
  Top Layer w0.15: C15.1@23.6,12.375 23.45,12.525 23.106,12.525 22.701,12.93 22.701,13.688 22.892,13.879 23.089,13.879 23.3,14.09 C13.1@23.3,14.1 24.425,14.1 24.725,14.4 C14.1@24.8,14.4 24.95,14.25 25.95,14.25 ; U1.31@26.125,16.025 U1.33@26.825,16.025 ; C16.1@26.6,13 26.535,13.065 26.535,13.665 25.95,14.25 ; v1@26.825,16.8 U1.33@26.825,16.025 ; U1.34@27.175,16.025 U1.33@26.825,16.025 ; v1(32.75,13.185) 32.787,13.223 33.763,13.223 v1(33.8,13.26) ; C49.1@47.5,4.401 C49.1@47.3,4.201 47.3,5.2 L3.2@47.6,5.5 ; 25.95,14.25 26.85,15.15 26.825,15.175 U1.33@26.825,16.025
  Top Layer w0.8: v1(49.9,4.3) 51.081,4.3 51.781,3.6 TP5.1@51.9,3.6
  POWER w0.15: v1@26.825,16.8 26.846,16.8 27.138,17.092 27.15,17.092 27.483,17.425 29.642,17.425 30.025,17.042 30.025,14.785 31.624,13.185 v1(32.75,13.185) ; v1(26.9,15.2) 27.604,14.496 27.604,13.596 27.814,13.386 28.114,13.386 v1(28.2,13.3) ; v1@33.763,13.223 v1(33.8,13.26)
  POWER w0.8: v1(49.9,4.3) 49.3,4.3 v1(48.1,5.5) 48.1,11.05 v1(48.65,11.6) 48.65,10.575 50.65,8.575
  other v1: 26.825,16.9
VDD3V3: C33.1 C34.1 C35.2 C36.2 C37.1 C38.2 C46.1 C60.1 C61.2 FB5.1 J3.4 J4.8 L1.2 R2.1 R3.1 R4.1 R5.1 R6.1 R7.1 R9.1 R10.1 R19.1 R20.1 R21.1 R22.1 R23.1 R44.2 R51.2 R53.2 TP7.1 U1.13 U1.57 U1.66 U2.4 U3.8 U4.22 U8.1 U9.7 U9.8 | length 151.5
  Top Layer w0.15: v1(16.275,21.025) 17.075,21.025 17.3,20.8 17.45,20.8 17.7,20.55 R2.1@17.7,20.525 R2.1@17.7,20.5 ; v1(21.433,20.067) 21.5,20 22.5,20 U1.13@22.525,19.975 ; v1(30.4,21.1) 30.45,21.05 31.45,21.05 U1.57@31.475,21.025 ; U1.66@31.475,24.175 31.5,24.2 31.576,24.2 31.576,24.256 v1(31.695,24.375) ; U9.7@53.95,19.465 v1(54.45,19.465)
  Top Layer w0.8: v1(5.45,9.65) C38.2@6.1,9.65 ; v1(6.2,6.499) 6.2,6.45 7.025,5.625 R10.1@8.2,5.625 ; R6.1@17.7,14.525 v1(18.9,14.525) ; L1.2@40.3,5.5 C46.1@40.3,4.201 41.774,4.201 v1(41.9,4.075) ; v1(49.1,28.615) 49.1,26.177 49.799,25.478 49.799,17.901 50.9,16.8 v1(53.499,16.8) ; v1(50.4,31.899) C34.1@53.4,31.899
  POWER w0.15: v1(30.4,21.1) 31,21.7 31,23.68 31.6,24.28 31.6,24.4 31.67,24.4 v1(31.695,24.375) ; v1(53.499,16.8) 53.621,16.8 53.797,16.624 53.975,16.624 53.975,18.99 v1(54.45,19.465) 57.275,22.29 57.79,22.29 v1(57.8,22.3)
  POWER w0.8: v1(18.9,20.5) 19.333,20.067 v1(21.433,20.067) ; J4.8@19.43,36 19.564,35.866 20.265,35.866 21.432,34.7 21.605,34.7 21.633,34.672 26.306,34.672 v1(27.5,33.479) 27.5,30.169 27.969,29.7 28.978,29.7 30.214,28.465 30.214,28.412 30.25,28.375 30.25,26.448 31.695,25.003 ; v1(31.695,24.375) 31.695,25.003 ; v1(32.7,25.5) 32.164,25.5 31.695,25.031 31.695,25.003 ; v1@32.8,25.5 41.5,25.5 ; v1(34.4,16.325) 34.4,16.298 35.248,15.45 36.005,15.45 36.555,16 ; v1(34.4,18.725) 34.53,18.595 v1(35.6,18.595) 36.45,17.745 36.45,16.948 36.45,16.105 36.555,16 ; v1@34.442,21.183 v1@35.883,21.183 ; v1(35.9,21.2) 35.9,22 36.5,22.6 41.5,22.6 ; v1(41.9,4.075) 42.675,3.3 44.7,3.3 v1(45,3.6) 45.95,2.65 52.294,2.65 53.95,4.306 v1(53.95,4.95) ; v1(50.4,31.899) 50.369,31.899 49.9,31.43 49.9,29.415 v1(49.1,28.615) 49.1,25.969 48.631,25.5 41.5,25.5 ; v1(53.499,16.8) 53.499,14.102 58,9.601 v1(58,4.5) ; 36.555,16 v1(37.313,16) 40.531,16 41.5,16.969 41.5,22.6 ; 41.5,22.6 41.5,25.5
  Bottom Layer w0.8: v1(53.95,4.95) 55.201,4.95 56.001,4.15 57.65,4.15 v1(58,4.5)
  other v1: 10.595,6.295 19.705,6.295 20.5,16.7 17.7,17.525 18.9,17.525 34.4,21.225
VDD18A_USB: C21.1 C22.2 FB2.2 U1.68 | length 43.2
  Top Layer w0.15: C22.2@31.1,26 31.041,25.941 30.703,25.941 30.337,25.575 30.337,24.987 U1.68@30.325,24.975 30.35,24.95 30.35,24.59 30.4,24.54 30.4,24.528 30.503,24.425 30.965,24.425 31.465,24.925 33.187,24.925 33.762,25.5 37.944,25.5 38.119,25.325 40.517,25.325 41.175,24.667 41.175,21.533 v1(40.65,21.008)
  Top Layer w0.5: FB2.2@53.7,8.185 v1(53.7,8.2)
  POWER w0.5: v1(51,18.422) 51,13.4 54.801,9.599 ; v1(53.7,8.2) 53.719,8.219 53.719,8.517 54.801,9.599 ; v1(56.8,9.599) 54.801,9.599
  Bottom Layer w0.5: v1(40.65,21.008) 48.415,21.008 v1(51,18.422)
VDDC: C1.2 C2.1 C3.1 C4.1 C5.1 C6.2 C7.2 C8.1 C9.1 C10.1 C48.1 L2.2 R46.2 TP4.1 U1.9 U1.16 U1.50 U1.61 U1.71 | length 77
  Top Layer w0.15: C1.2@20.25,21 20.625,21.375 U1.9@22.525,21.375 23.525,21.375 23.825,21.075 23.825,19.325 v1@23.425,18.925 ; U1.16@22.525,18.925 v1@23.212,18.925 ; C7.2@29.4,27.3 29.275,27.175 U1.71@29.275,24.975 29.275,24.425 29.579,24.121 29.979,24.121 30,24.1 v1(30,24.05) 30,23.978 30.3,23.678 30.3,22.9 30.775,22.425 U1.61@31.475,22.425 ; v1(30.4,18.588) 30.406,18.581 31.469,18.581 U1.50@31.475,18.575 ; v1@32.23,18.425 v1(32.352,18.425)
  Top Layer w0.8: v1(32.6,3.8) 32.789,3.8 33.19,4.201 C48.1@35.1,4.201 ; L2.2@35.6,5.5 35.153,5.5 35.153,4.253 C48.1@35.101,4.201 ; v1(36.7,4.1) 36.599,4.201 C48.1@35.101,4.201 ; C2.1@58.7,7.6 C8.1@60.275,7.6 ; C9.1@59.2,9.599 C10.1@61.5,9.599 61.5,9.55 61.579,9.471 62.376,9.471 62.95,8.896 62.95,7.3 ; C3.1@59.9,3.5 60.1,3.3 62.083,3.3 62.95,4.167 62.95,7.3 ; C8.1@60.4,7.475 C4.1@62.1,7.475 62.775,7.475 62.95,7.3
  POWER w0.15: v1@23.212,18.925 v1(23.3,18.925) 29.7,18.925 ; v1@30,24.1 v1(30,24.05) 30,22.79 29.7,22.49 29.7,18.925 ; v1(30.4,18.588) 30.36,18.627 29.998,18.627 29.7,18.925 ; v1(32.352,18.425) 32.352,16.888 32.44,16.8 v1@33.1,16.8
  POWER w0.8: v1(36.7,4.1) 39.1,1.7 58.029,1.7 v1@59.864,3.536
  other v1: 59.9,3.571 33,16.9
VDDC_RTC: C17.1 C18.2 U1.37 | length 4.9
  Top Layer w0.2: C18.2@28.1,11.8 28.2,11.9 28.404,11.9 28.75,12.246 28.75,14.587 28.587,14.749 28.386,14.749 C17.1@28.2,14.936 ; C17.1@28.225,14.982 U1.37@28.225,16.025
WIFI_ANT: E1.1 U4.2 | length 9.1
  Top Layer w0.762: E1.1@46.519,35.482 46.519,28.706 46.6,28.625 U4.2@46.6,26.369
WIFI_VDD: C40.1 C44.2 FB5.2 U4.9 | length 10.5
  Top Layer w0.5: U4.9@40.3,26.187 v1(40.3,26.4)
  POWER w0.5: v1(40.3,26.4) 43.085,26.4 v1(45.539,28.853) 45.558,28.872 45.972,28.872 46.908,29.808 47.392,29.808 v1(47.4,29.8) 48.677,29.8 49.023,30.146 v1(49.05,30.146)
WL_HOST_WAKE: R25.2 U1.43 U4.13 | length 42
  Top Layer w0.2: R25.2@25.525,7.6 25.531,7.606 v1(25.551,7.606) ; U1.43@30.325,16.025 30.325,15.335 30.594,15.066 v1(30.594,14.958)
  POWER w0.2: v1(30.594,14.958) 31.152,14.4 36.158,14.4 37.108,15.35 40.85,15.35 42.35,16.85 v1(42.35,24.45) v1@42.35,24.5 ; v1(39.3,27.5) v1(41.3,27.5)
  Bottom Layer w0.2: v1(25.551,7.606) 26.096,8.15 27.758,8.15 29.9,10.292 29.9,10.823 30.85,11.773 30.85,12.745 30.85,14.641 30.594,14.897 v1(30.594,14.958) ; v1(37.3,24.3) 37.3,25.5 v1(39.3,27.5) ; v1(41.3,27.5) 41.3,25.5 42.3,24.5 v1@42.35,24.5
WL_LDO_IN: C58.1 L4.2 U4.23 | length 15.8
  Top Layer w0.2: v1(30,3.2) C58.1@30,3.299
  Bottom Layer w0.2: v1(30,3.2) 30,3.923 31.05,4.973 v1(31.05,6.7) 32.4,6.7 34.063,8.363 34.063,10.463 34.85,11.25 35.487,11.25 v1(38.5,14.263)
WL_LDO_SW: L4.1 U4.21 | length 15.4
  Top Layer w0.2: L4.1@29,7.1 29,7.2 v1(29.1,7.3) ; U4.21@37.313,16.9 37.626,16.9 38.125,16.4 38.125,15.625 37.463,14.963 37.463,14.326 v1(37.4,14.263)
  Bottom Layer w0.2: v1(29.1,7.3) 30.1,8.3 32.3,8.3 32.95,8.95 32.95,9.853 37.36,14.263 v1(37.4,14.263)
WL_REG_ON: R24.2 U1.47 U4.12 | length 20.8
  Top Layer w0.2: U1.47@31.475,17.525 31.72,17.525 31.745,17.55 33.698,17.55 33.825,17.423 33.825,15.871 33.971,15.725 36.029,15.725 36.175,15.871 36.175,16.916 36.058,17.034 35.816,17.034 R24.2@35.6,17.25 ; R24.2@35.6,17.275 v1(35.6,17.3) ; U4.12@37.313,25 38.628,25 38.95,24.678 38.95,17.575 v1(38.375,17)
  Bottom Layer w0.2: v1(35.6,17.3) 35.621,17.279 36.2,17.279 36.529,16.95 38.276,16.95 v1@38.326,17
XTAL_XIN: C55.2 R43.2 U1.45 Y1.1 | length 19.7
  Top Layer w0.25: Y1.1@24.9,3.2 25.025,3.2 25.475,3.65 25.475,3.711 25.875,4.111 25.875,5.825 25.715,5.985 25.715,6.335 25.55,6.5 R43.2@25.525,6.5 25.5,6.5 24.765,7.235 24.535,7.235 24.4,7.37 24.4,7.39 24.535,7.525 24.535,7.735 25,8.2 27.7,8.2 29.6,10.1 29.6,11.1 31.775,13.275 31.775,15.638 31.187,16.226 U1.45@31.187,16.813
XTAL_XOUT: C56.2 R43.1 U1.46 Y1.3 | length 15.9
  Top Layer w0.25: Y1.3@27.1,4.8 26.696,5.204 26.696,5.604 26.354,5.946 26.354,6.379 R43.1@26.475,6.5 26.5,6.5 26.7,6.7 26.7,6.725 27.31,7.335 27.565,7.335 27.7,7.47 C56.2@27.7,7.49 ; C56.2@27.7,7.51 C56.2@27.7,7.49 ; U1.46@31.725,17.15 31.943,17.15 32.175,16.918 32.175,13.109 30,10.934 30,9.3 29.3,8.6 28.711,8.6 27.835,7.724 27.835,7.625 C56.2@27.7,7.49
ZQ_TP: TP1.1 U1.35 | length 11.1
  Top Layer w0.2: TP1.1@21.6,11.5 21.952,11.5 22.532,10.92 27.203,10.92 27.525,11.242 U1.35@27.525,16.025
pads on no net: J2.A8 J2.B8 SW1.1 SW1.4 SW2.1 SW2.4 U1.49 U4.4 U4.5 U4.6 U4.7 U4.8 U4.10 U4.11 U4.25 U4.26 U4.27 U4.28 U4.29 U4.30 U4.32 U4.34 U4.35 U4.37 U4.38 U4.39 U4.40 U4.41 U4.42 U4.43 U4.44 U4.45 U4.46 U4.47 U8.4 U9.5 U9.6 U9.12 U9.13 U10.

## Polygon pours and split planes (outlines as drawn)
VDDC on POWER "VDDC_L3" (solid, remove dead copper, pour order 1): 21.5,3 37.5,3 37.5,8.4 33.6,8.4 33.6,25.5 21.5,25.5
VDD1V35 on POWER "VDD1V35_L3" (solid, remove dead copper, pour order 2): 33.8,8 33.8,15.2 52.2,15.2 52.2,8
VDD1V8 on POWER "VDD1V8_L3" (solid, remove dead copper, pour order 4): 52.5,0.6 65.4,0.6 65.4,37.4 52.5,37.4
VDD3V3 on POWER "VDD3V3_L3" (solid, remove dead copper, pour order 3): 0.6,0.6 0.6,37.4 21,37.4 21,0.6
GND on GND "GND_L2" (solid, remove dead copper, pour order 0): 0.3,0.3 65.7,0.3 65.7,37.7 0.3,37.7
GND on Top Layer "GND_L1" (solid, remove dead copper, pour order 6): 0.6,0.6 65.4,0.6 65.4,37.4 0.6,37.4
GND on Bottom Layer "GND_L4" (solid, remove dead copper, pour order 5): 0.6,0.6 65.4,0.6 65.4,37.4 0.6,37.4

## Other copper
Top Layer:
  pour cut-out: 44.5,25.5 48.6,25.5 48.6,36.5 44.5,36.5
GND:
  pour cut-out: 44.8,25.8 48.3,25.8 48.3,36.6 44.8,36.6

## Silkscreen, mask and mechanical layers (free items; w line width, h text height)
Top Overlay:
  drawing of 2349 lines, arcs and shapes, not listed
Bottom Overlay:
  drawing of 2919 lines, arcs and shapes, not listed
Mechanical 1:
  the board outline again, w0.1

## Text inside footprints (layer, text, board x,y; h text height)
J2: Mechanical 13 "PCB EDGE" at 29.685,37.72 h0.81 r180